# Altium PCB PCB1.PcbDoc
Units mil, origin at the board's own origin, x right, y up, seen from the top; angles counter-clockwise.
Board outline 6000 x 4000 mil, 2 copper layers (Top Layer, Bottom Layer); 17 components, 11 nets, 37 pads, 0 vias.
Unrouted connection lines stored in the file: 2.
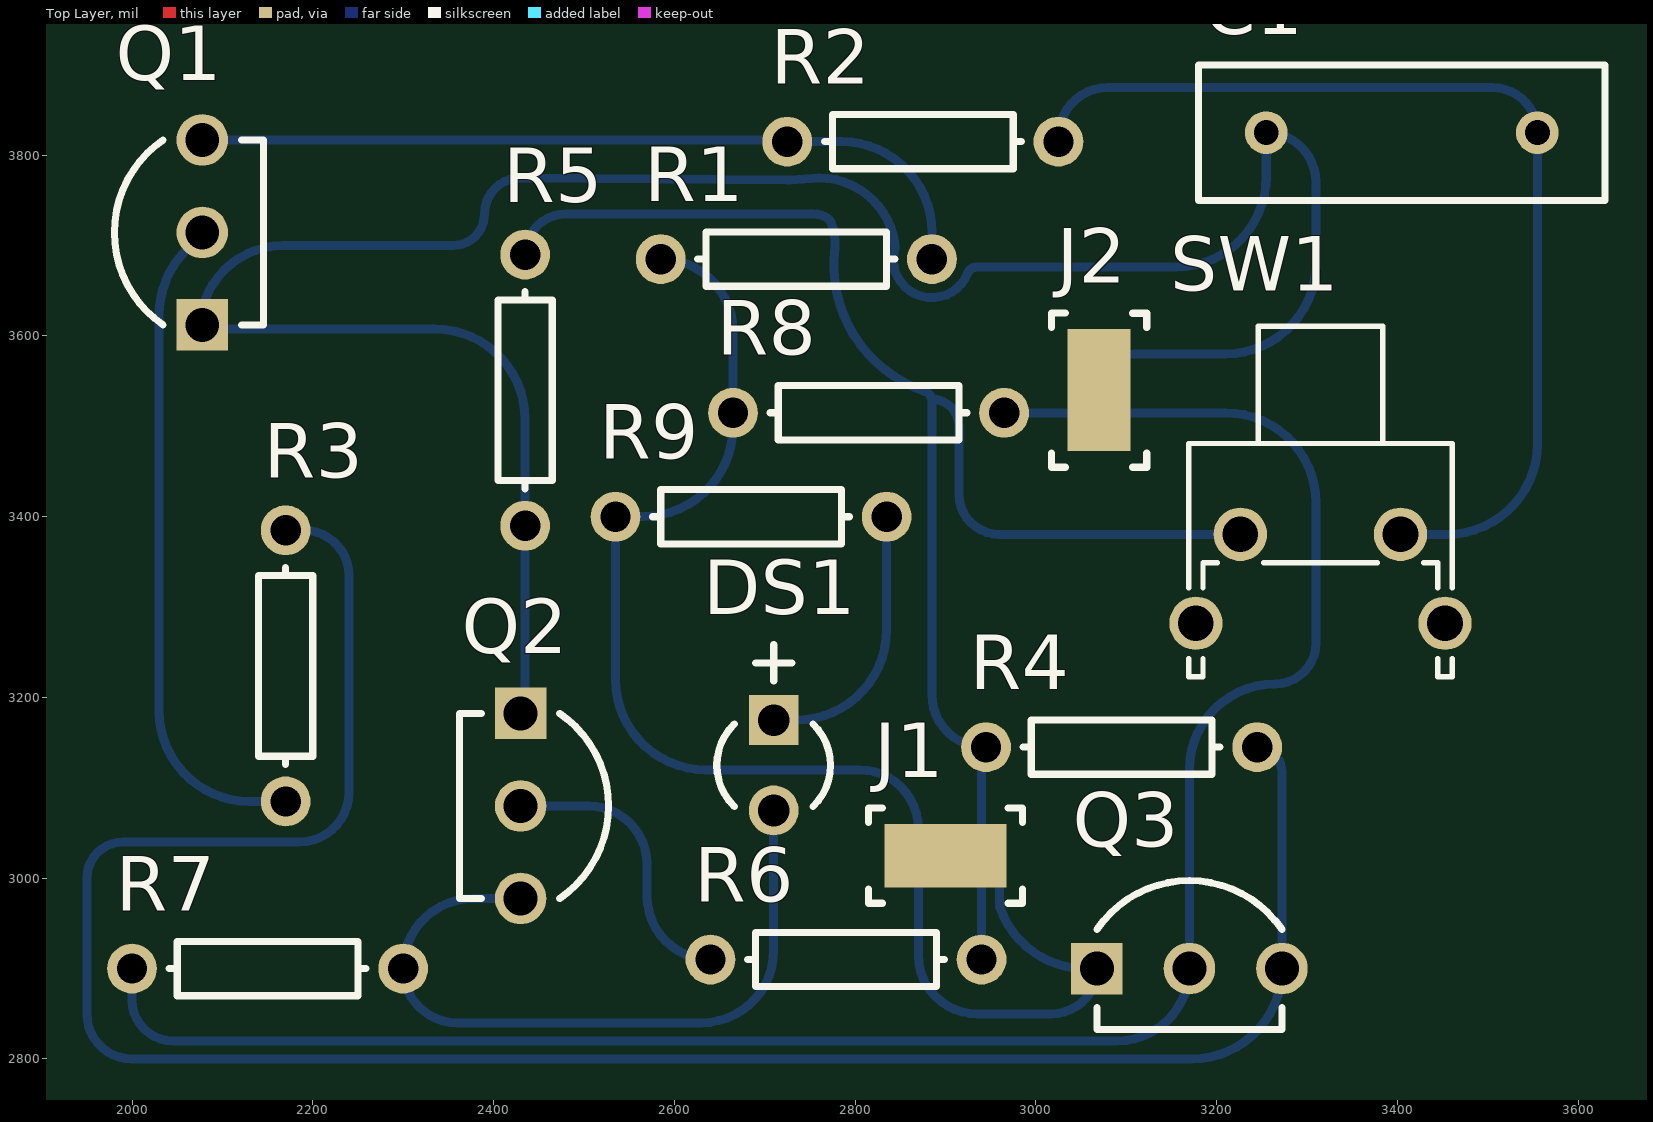
[diagram p0: Top Layer view]
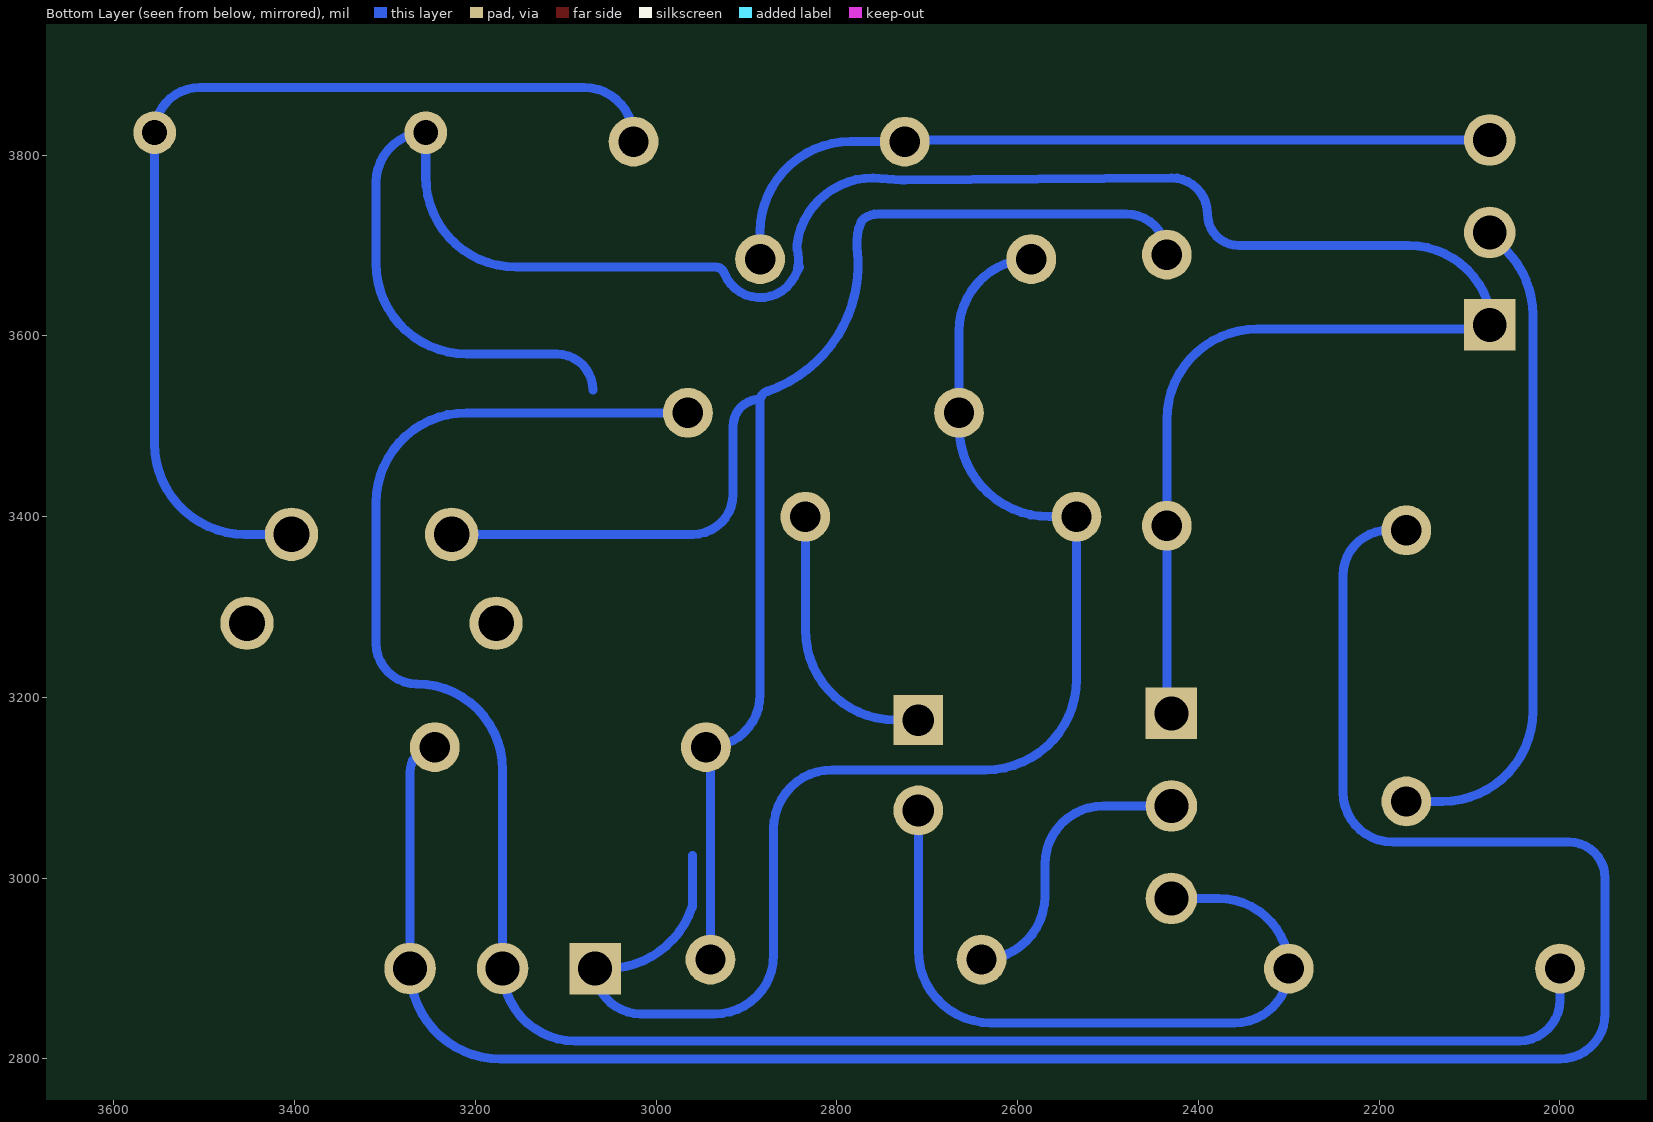
[diagram p1: Bottom Layer view, seen from below]

## Layer stack, top to bottom
Top Solder: solder mask 0.4, Solder Resist, Dk 3.5
Top Layer: signal copper 1.4
Dielectric 1: dielectric 12.6, FR-4, Dk 4.8
Bottom Layer: signal copper 1.4
Bottom Solder: solder mask 0.4, Solder Resist, Dk 3.5

## Board outline
1000,1000 7000,1000 7000,5000 1000,5000

## Design rules (kind name [scope] priority, off if disabled: settings)
Clearance [All] p1: gap=10 ignorepadtopadclearanceinfootprint=FALSE
PolygonConnect [All] p1: connectstyle=Relief reliefconductorwidth=10 reliefentries=4 polygonreliefangle="90 Angle" airgapwidth=10
RoutingVias [All] p1: holewidth=28 width=50 viastyle="Through Hole" minholewidth=28 minwidth=50 maxholewidth=28 maxwidth=50
SolderMaskExpansion [All] p1: expansion=0 istentingtop=FALSE
SupplyNets "Schematic Supply Nets_1" [InNet('GND')] p1: voltage=0.000
SupplyNets "Schematic Supply Nets" [InNet('VCC')] p2: voltage=0.000
Width [All] p1: maxlimit=10 minlimit=10 preferedwidth=10
30 further rules are at their usual default settings.

## Components (designator, comment, footprint, x,y, rotation, side; value= is the part's Value field where it differs from the comment)
C1 "Cap" RAD-0.3 3405,3825 r0 top value=1nF
DS1 "WP710A10QBC/D" KING-WP710A10QBCD_V 2710,3125 r270 top
J1 "5015" FP-5015-MFG 2900,3025 r180 top
J2 "5015" FP-5015-MFG 3070,3540 r90 top
Q1 "2N5551TF" FP-135AR-MFG#1 2062.8,3714.59 r180 top
Q2 "2N5551TF" FP-135AR-MFG#1 2444.96,3080 r0 top
Q3 "2N5401YTA" FP-135AR-MFG#2 3170,2915 r90 top
R1 "Res1" AXIAL-0.3 2735,3685 r180 top value=470K
R2 "Res1" AXIAL-0.3 2875,3815 r0 top value=470K
R3 "Res1" AXIAL-0.3 2170,3235 r90 top value=10K
R4 "Res1" AXIAL-0.3 3095,3145 r180 top value=10K
R5 "Res1" AXIAL-0.3 2435,3540 r270 top value=10K
R6 "Res1" AXIAL-0.3 2790,2910 r180 top value=1K
R7 "Res1" AXIAL-0.3 2150,2900 r0 top value=100K
R8 "Res1" AXIAL-0.3 2815,3515 r0 top value=1M
R9 "Res1" AXIAL-0.3 2685,3400 r0 top value=100
SW1 "431256058716" 4312560587x6 3315,3415 r180 top

## Footprints (in the part's own frame and the unit in brackets; to place one, negate y for a bottom-side part, rotate by r counter-clockwise, add the part's x,y. Pads: shape width x height; smd on the part's side, far side on the other; paste and mask are expansions set on the pad)
4312560587x6 [mm] "6x6mm right angle Tact Switch with ground terminal, THT version"
  round 1.5 hole 1: 1(-2.25,0.875) 2(2.25,0.875) G1(-3.5,3.375) G2(3.5,3.375)
  silkscreen extent -3.7,-4.98 3.7,4.87, body extent -4.2,-4.97 4.2,4.87, height 7.25
AXIAL-0.3 [mm] "Axial Device, Thru-Hole; 2 Leads; 0.3 in Pin Spacing"
  round 1.4 hole 0.85: 1(-3.81,0) 2(3.81,0)
  silkscreen extent -2.77,-0.76 2.77,0.76
FP-135AR-MFG#1 [mm]
  rect 1.45x1.45 hole 0.95: 1(-0.38,2.6)
  round 1.45 hole 0.95: 2(-0.38,0) 3(-0.38,-2.6)
  silkscreen extent -2.09,-2.6 2.09,2.6, body extent -2.19,-3.42 2.19,3.42, height 0.25
FP-135AR-MFG#2 [mm]
  rect 1.45x1.45 hole 0.95 paste-2539.97 mask+0: 1(-0.38,2.6)
  round 1.45 hole 0.95 paste-2539.97 mask+0: 2(-0.38,0) 3(-0.38,-2.6)
  silkscreen extent -2.09,-2.6 2.09,2.6, body extent -2.19,-3.42 2.19,3.42, height 0.25
FP-5015-MFG [mm]
  rect 3.43x1.78 smd paste+0 mask+0: 1(0,0)
  silkscreen extent -2.16,-1.34 2.17,1.34
KING-WP710A10QBCD_V [mm] "THD, 2-Leads, Dia 3.2mm"
  rect 1.4x1.4 hole 0.889 paste-2539.97 mask+0.064: 1(-1.27,0)
  round 1.4 hole 0.889 paste-2539.97 mask+0.064: 2(1.27,0)
  silkscreen extent -3.39,-1.6 1.16,1.6
RAD-0.3 [mm] "Radial Cap, Thru-Hole; 2 Leads; 0.3 in Pin Spacing"
  round 1.2 hole 0.7: 1(-3.81,0) 2(3.81,0)
  silkscreen extent -5.71,-1.91 5.71,1.91

## Part data
C1: "Capacitor", LatestRevisionDate=17-Jul-2002, LatestRevisionNote="Re-released for DXP Platform.", PackageDescription="Radial Cap, Thru-Hole; 2 Leads; 0.3 in Pin Spacing", PackageReference=RAD-0.3, Published=8-Jun-2000, Publisher="Altium Limited"
DS1: library part CMP-2000-07416-1, "Blue LED, 3.3 V, 20 mA, -40 to 85 degC, 2-Pin THD, RoHS, Bulk", Forward Current=20mA, Forward Voltage=3.3V, Illumination Color=Blue, Lens Color/Style=WaterClear, Manufacturer=Kingbright, Maximum Operating Temperature=+85C, Minimum Operating Temperature=-40C, Package Description="2-Pin Through Hole Device, Dia 3.2 mm", Package Reference=WP710A10QBCD, Wavelength/Color Temperature=470nm, Datasheet URL=https://datasheet.ciiva.com/2121/wp710a10qbc-d-2121617.pdf, Datasheet Version="Rev. 5B, 09/2014", Factory Pack Quantity=500, LED Size=T-1, Lens Dimensions=3mmx4.6mm, Lens Shape=Dome, Luminous Intensity=1600mcd, Manufacturer URL=http://www.kingbright.com/, Mounting Style=ThroughHole, Mounting Technology=ThroughHole, Packaging=Bulk, Product Category=StandardLEDs-ThroughHole, RoHS=Details, Type=SolidStateLEDLamp, Viewing Angle=20deg
J1 J2: library part CMP-2000-05183-2, "PC TEST POINT MINIATURE", Manufacturer=keystone, Automotive=No, Category=Conn, ComponentLink2Description=Datasheet, ComponentLink2URL=http://www.keyelco.com/product-pdf.cfm?p=1353, Conn Orientation=Straight, Contact Material=Silver, Device Class L1=Connectors, Device Class L2=unset, Device Class L3=unset, Digikey Description="PC TEST POINT MINIATURE", Height=1.65mm, Lead Free=Yes, Manufacturer Part Number=5015, Number Of Contacts=1, Octopart=https://octopart.com/5015-keystone-3822, Package=5015, RoHS=TRUE
Q1 Q2: library part CMP-00278-84408890-1, "2N5551TF Small Signal Bipolar Transistor, 0.6A I(C), 160V V(BR)CEO, 1-Element, NPN, Silicon, TO-92", Case/Package=TO-92-3, Collector Base Voltage (VCBO)=180V, Collector Emitter Breakdown Voltage=160V, Collector Emitter Saturation Voltage=200mV, Current Rating=600mA, Emitter Base Voltage (VEBO)=6V, Frequency=300MHz, Manufacturer Lifecycle Status=ACTIVE, Max Junction Temperature (Tj)=150°C, Max Power Dissipation=625mW, Min Operating Temperature=-55°C, Transition Frequency=100MHz, Collector Emitter Voltage (VCEO)=160V, Contact Plating=Tin, Element Configuration=Single, Gain Bandwidth Product=100MHz, Height=8.77mm, hFE Min=80, Lead Free="Lead Free", Length=5.2mm, Lifecycle Status=Production, Max Breakdown Voltage=160V, Max Collector Current=600mA, Max Frequency=300MHz, Max Operating Temperature=150°C, Mount="Through Hole", Number of Elements=1, Number of Pins=3, Polarity=NPN, Power Dissipation=625mW, Radiation Hardening=No, RoHS=Compliant, Schedule B="8541210080, 8541210080|8541210080|8541210080|8541210080|8541210080", Voltage Rating (DC)=160V, Weight=240mg, Width=4.19mm
Q3: library part CMP-00278-84793548-1, "2N5401YTA Bipolar (BJT) Transistor PNP 150 V 600 mA 400MHz 625 mW Through Hole TO-92-3", Case/Package=TO-92-3, Collector Base Voltage (VCBO)=160V, Collector Emitter Breakdown Voltage=150V, Current Rating=-600mA, Emitter Base Voltage (VEBO)=5V, Frequency=400MHz, Manufacturer Lifecycle Status=ACTIVE, Max Collector Current=600mA, Max Operating Temperature=150°C, Max Power Dissipation=625mW, Min Operating Temperature=-55°C, Voltage Rating (DC)=-160V, Collector Emitter Voltage (VCEO)=150V, Element Configuration=Single, Gain Bandwidth Product=400MHz, Lead Free="Lead Free", Lifecycle Status=Production, Mount="Through Hole", NexarPartId=84793548, Number of Elements=1, Number of Pins=3, Polarity=PNP, Power Dissipation=625mW, RoHS=Compliant, Schedule B=8541210080, Transition Frequency=400MHz, Weight=240mg
R1 R2 R3 R4 R5 R6 R7 R8 R9: "Resistor", LatestRevisionDate=17-Jul-2002, LatestRevisionNote="Re-released for DXP Platform.", PackageDescription="Axial Device, Thru-Hole; 2 Leads; 0.3 in Pin Spacing", PackageReference=AXIAL-0.3, Published=8-Jun-2000, Publisher="Altium Limited"
SW1: library part CMP-1458-00007-4, "Tactile Switch, 0.05A, 12Vdc, 160Gf, Tht Rohs Compliant: Yes", Current Rating=50mA, Insulation Resistance=100MΩ, Max Operating Temperature=85°C, Min Operating Temperature=-40°C, Voltage Rating=12V, Actuator Material="Liquid Crystal Polymer, Polymer", Contact Plating=Silver, Diameter=3mm, Height=5.85mm, Illumination Type=Non-Illuminated, Mechanical Life=200kcycles, Packaging=Bulk, RoHS=Compliant, Switch Function=Off-Mom, Switch Travel=250µm, Termination="PC Pin", Throw Configuration=SPST

## Nets (pads, with @x,y where several pads share a name; then routed paths per layer and width w, separated by ;. In a path a pad name is that pad's centre, name@x,y a point inside that pad or via, vN(x,y) a via of type N, cw(c..) or ccw(c..) an arc to the next point about the centre after c; other vN are vias at no path point)
GND: C1.1 J2.1 Q1.1 Q2.1 R5.2 | length 2715.9
  Bottom Layer w10: Q2.1@2435,3187.4 R5.2 2435,3507.64 ccw(c2335,3507.64) 2335,3607.64 2075,3607.64 cw(c2167.36,3607.64) 2167.36,3700 2355,3700 ccw(c2355,3735) 2390,3735 cw(c2430,3735) 2430,3775 cw(c2430,3765) 2430.09,3775 2724.63,3772.44 ccw(c2725,3815) 2728.25,3772.57 2760,3775 cw(c2760,3690) 2844.35,3700.49 cw(c2834.42,3699.29) 2844.06,3696.61 ccw(c2885,3685) 2843.71,3674.68 ; 2841.66,3676.16 2842.7,3674.15 2847.2,3665.45 ccw(c2885,3685) 2924.75,3669.78 cw(c2934.06,3666.16) 2934.02,3676.16 3155,3676.16 ccw(c3155,3776.16) 3255,3776.16 C1.1 cw(c3255,3770) 3310,3770 3310,3680.25 cw(c3210,3680.25) 3210,3580.25 3152.9,3580.25 ccw(c3155.13,3590) 3154.87,3580 ; 3070,3540 cw(c3110,3540) 3110,3580 3154.87,3580 ; 3155,3580 3154.87,3580
NetC1_2: C1.2 R2.2 SW1.1 | length 1142.9
  Bottom Layer w10: R2.2@3025,3820 cw(c3080,3820) 3080,3875 3505,3875 cw(c3505,3825) C1.2 3555,3480.55 cw(c3455,3480.55) 3455,3380.55 SW1.1
NetDS1_1: DS1.1 R9.2 | length 307.1
  Bottom Layer w10: DS1.1 2735,3175 ccw(c2735,3275) 2835,3275 R9.2
NetDS1_2: DS1.2 Q2.3 R7.2 | length 829.3
  Bottom Layer w10: Q2.3@2440.04,2977.64 2377.64,2977.64 ccw(c2377.64,2900) R7.2 ccw(c2360,2900) 2360,2840 2630,2840 ccw(c2630,2920) 2710,2920 DS1.2
NetQ1_2: Q1.2 R3.1 | length 736.4
  Bottom Layer w10: Q1.2@2075,3710 2059.29,3694.29 ccw(c2130,3623.58) 2030,3623.58 2030,3185 ccw(c2130,3185) 2130,3085 R3.1
NetQ1_3: Q1.3 R1.1 R2.1 | length 896.6
  Bottom Layer w10: Q1.3 2723.05,3816.95 cw(c2723.05,3815) R2.1 2785,3815 cw(c2785,3715) 2885,3715 2885,3705 R1.1@2900,3690
NetQ2_2: Q2.2 R6.2 | length 312
  Bottom Layer w10: Q2.2@2440.04,3080 2505,3080 cw(c2505,3015) 2570,3015 2570,2980 ccw(c2640,2980) R6.2
NetQ3_2: Q3.2 R7.1 R8.2 | length 2273.3
  Bottom Layer w10: R7.1 2000,2865 ccw(c2045,2865) 2045,2820 3089.96,2820 ccw(c3089.96,2900.04) Q3.2 3170,3120 cw(c3265,3120) 3265,3215 ccw(c3265,3260) 3310,3260 3310,3415 ccw(c3210,3415) 3210,3515 R8.2
NetQ3_3: Q3.3 R3.2 R4.1 | length 2501.4
  Bottom Layer w10: R3.2 2190,3385 cw(c2190,3335) 2240,3335 2240,3095 cw(c2185,3095) 2185,3040 1990,3040 ccw(c1990,3000) 1950,3000 1950,2850 ccw(c2000,2850) 2000,2800 3172.36,2800 ccw(c3172.36,2900) Q3.3 ; R4.1 cw(c3245,3117.64) 3272.36,3117.64 Q3.3
NetR4_2: R4.2 R5.1 R6.1 SW1.2 | length 1728
  Bottom Layer w10: R5.1 cw(c2480,3690) 2480,3735 2754.1,3735 cw(c2754.1,3707.23) 2770.01,3729.99 cw(c2764.25,3721.81) 2773.08,3726.52 cw(c2764.25,3721.82) 2773.39,3725.88 cw(c2724.32,3704.05) 2777.63,3697.54 ccw(c2924.75,3679.15) 2876.91,3538.82 ccw(c2924.75,3679.15) 2876.97,3538.8 cw(c2872.69,3526.31) 2882.21,3535.47 cw(c2875,3528.53) 2884.58,3531.4 2885,3530 ; R6.1 2940,3140 cw(c2945,3140) R4.2 ; R4.2@2945,3145.08 cw(c2943.23,3203.28) 2885,3203.28 2885,3530 ; SW1.2 2959.45,3380.55 cw(c2959.45,3425) 2915,3425 2915,3500 ccw(c2885,3500) 2885,3530
VCC: J1.1 Q3.1 R1.2 R8.1 R9.1 | length 1624.3
  Bottom Layer w10: R1.2 cw(c2585,3605) 2665,3605 R8.1 2665,3500 cw(c2565,3500) 2565,3400 R9.1 2535,3220 ccw(c2635,3220) 2635,3120 2805,3120 cw(c2805,3055) 2870,3055 2870,2915 ccw(c2935,2915) 2935,2850 3017.6,2850 ccw(c3017.6,2900.04) Q3.1 3055,2900.04 3044.09,2900.64 cw(c3055,3000.04) 2960.54,2967.22 cw(c2970,2970.46) 2960,2970.41 2960,3025
pads on no net: SW1.G1 SW1.G2